# Altium PCB PCB1.pcbdoc
Units mil, origin at the board's own origin, x right, y up, seen from the top; angles counter-clockwise.
Board outline 5500 x 4110 mil, 2 copper layers (Top Layer, Bottom Layer); 18 components, 15 nets, 64 pads, 0 vias.
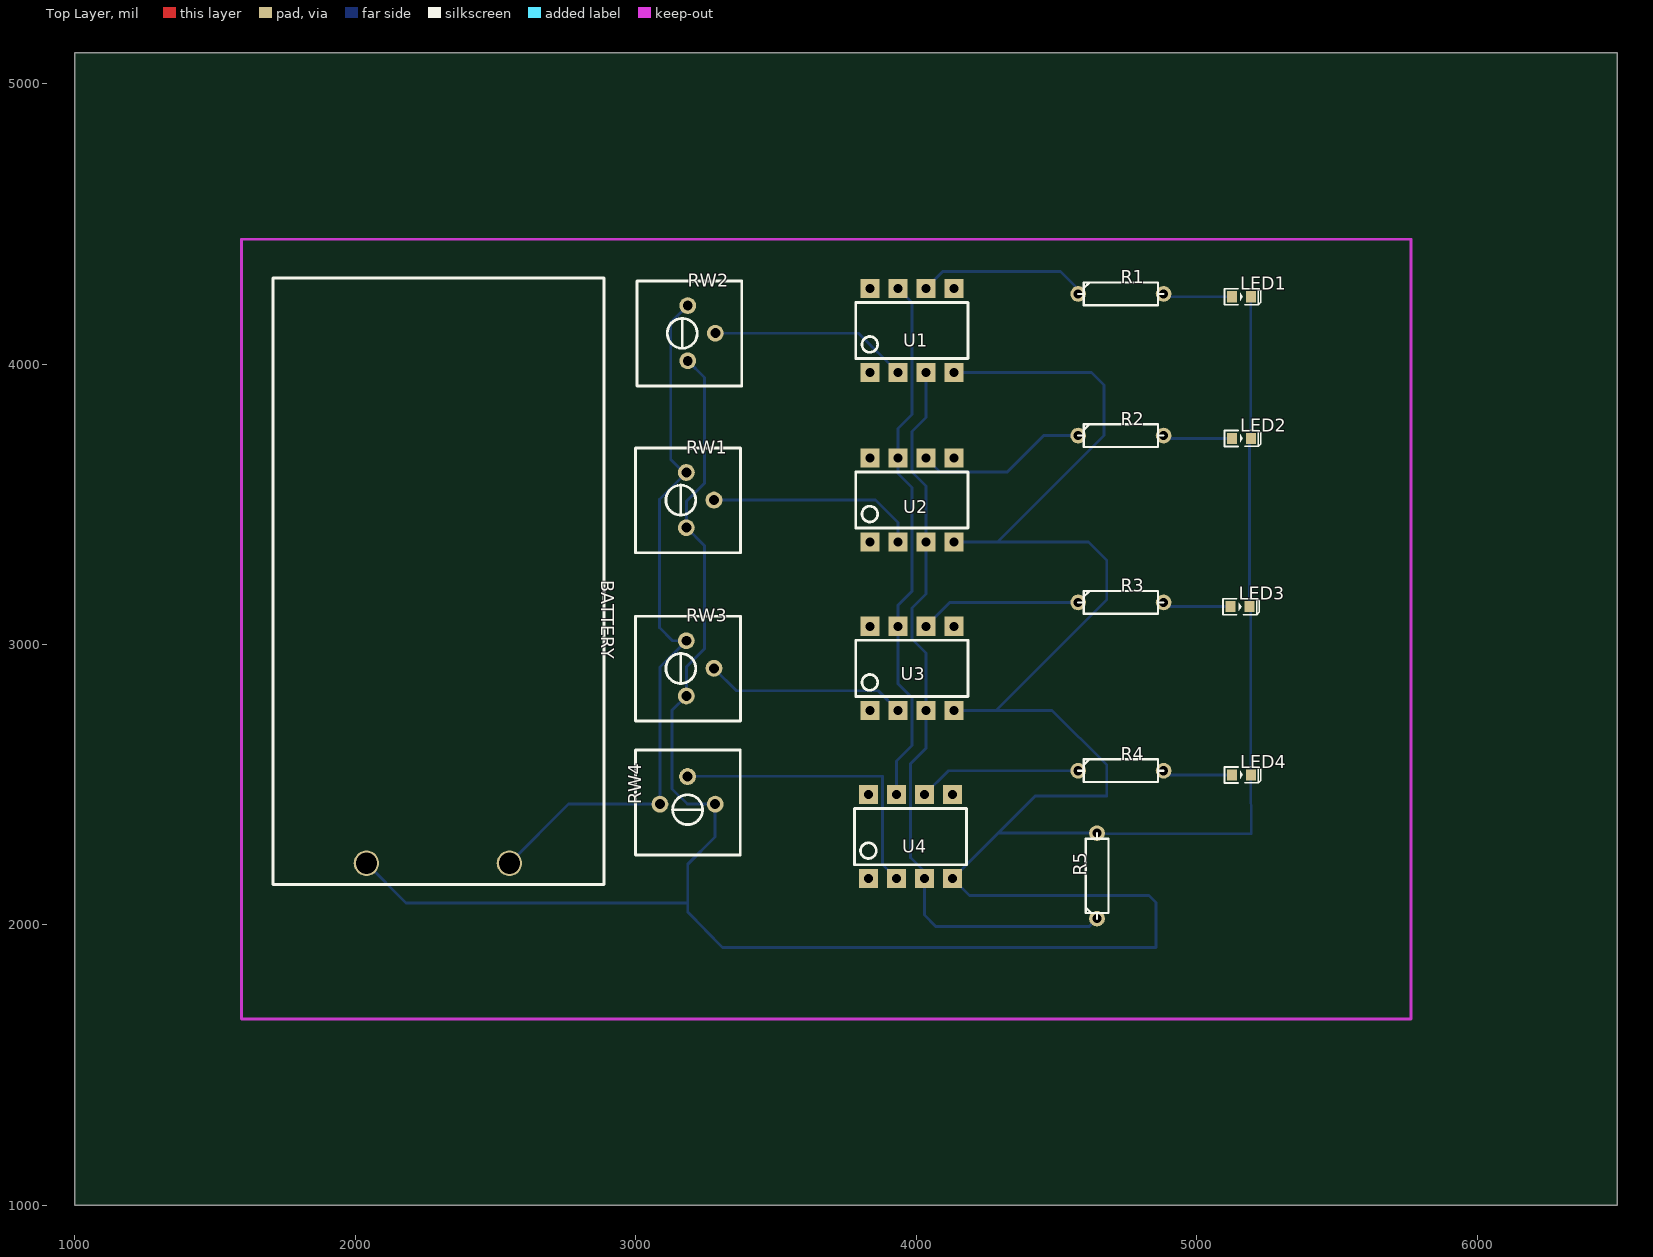
[diagram p0: Top Layer view]
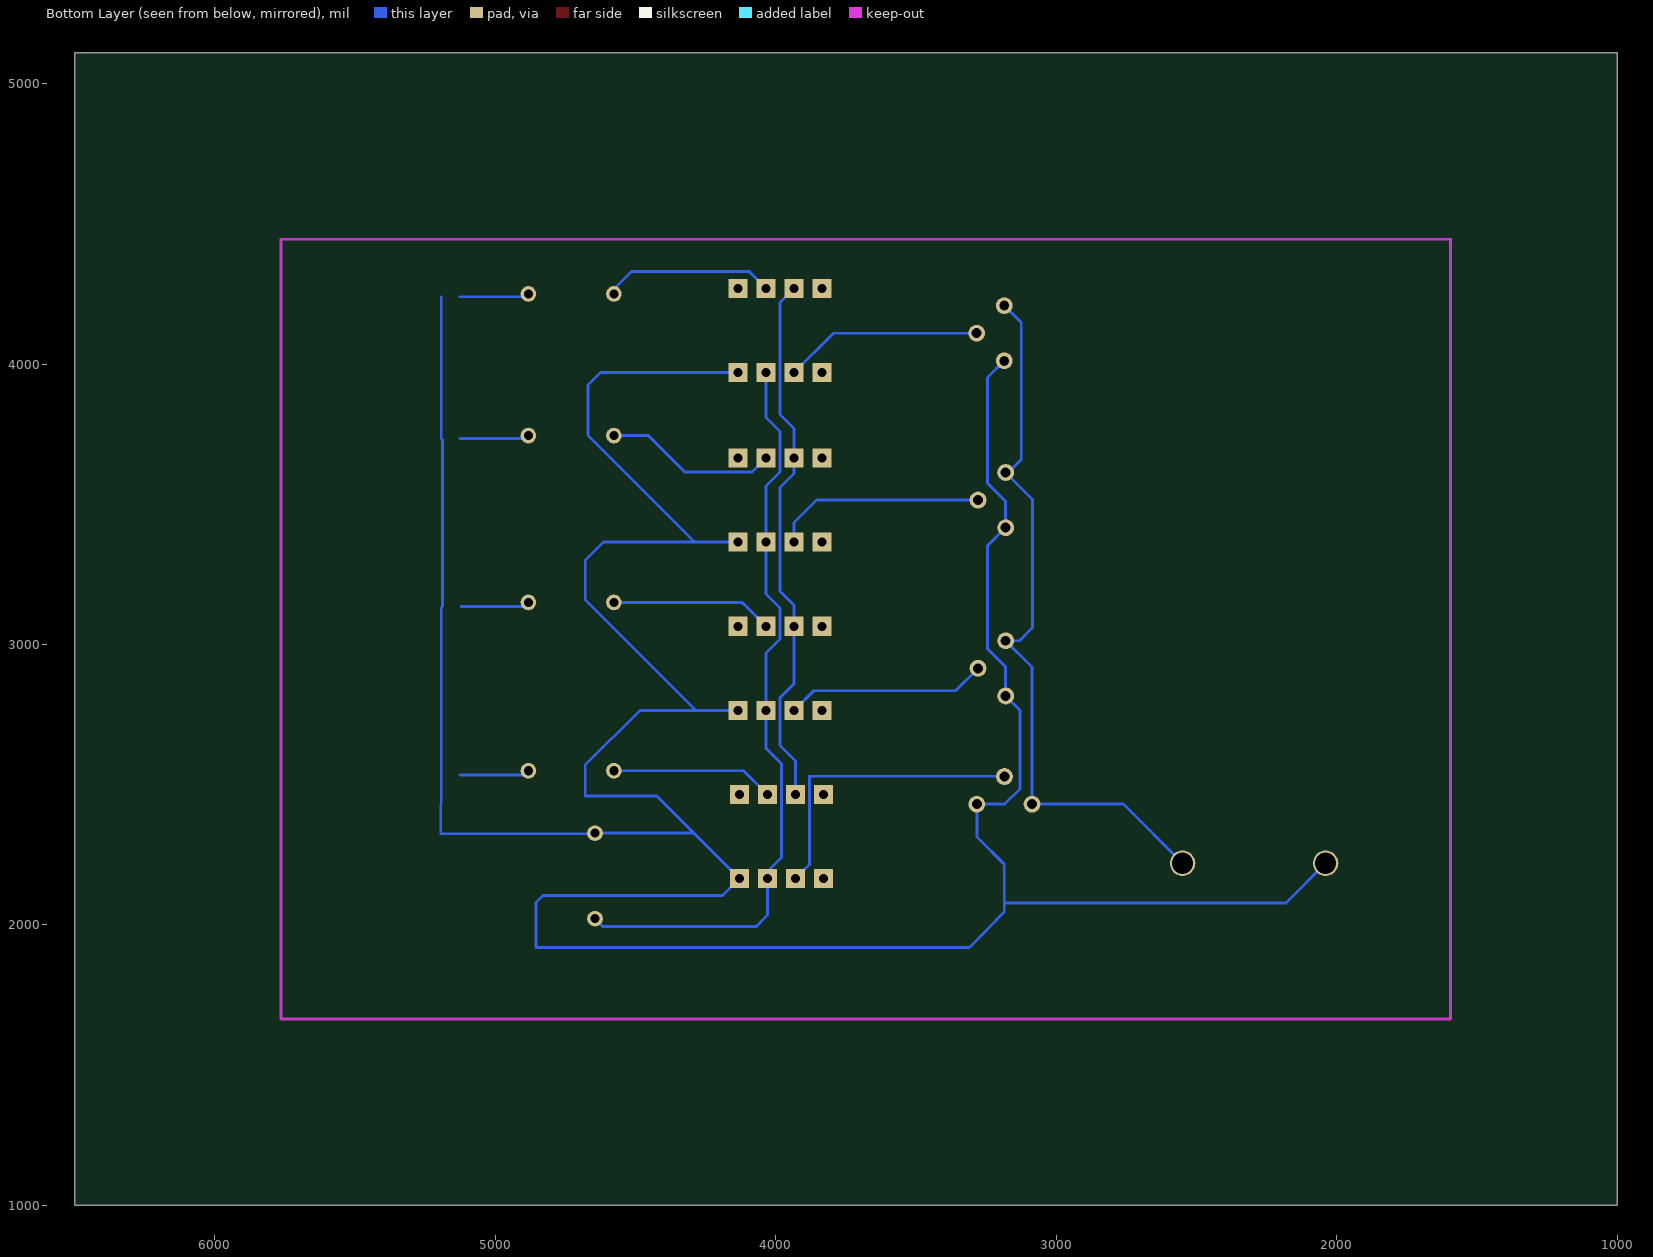
[diagram p1: Bottom Layer view, seen from below]

## Layer stack, top to bottom
Top Solder: solder mask 0.4, Solder Resist, Dk 3.5
Top Layer: signal copper 1.4
Dielectric1: dielectric 12.6, FR-4, Dk 4.8
Bottom Layer: signal copper 1.4
Bottom Solder: solder mask 0.4, Solder Resist, Dk 3.5

## Board outline
6500,1000 1000,1000 1000,5110 6500,5110

## Design rules (kind name [scope] priority, off if disabled: settings)
Clearance [All] p1: gap=10 ignorepadtopadclearanceinfootprint=FALSE
PolygonConnect [All] p1: connectstyle=Relief reliefconductorwidth=10 reliefentries=4 polygonreliefangle="90 Angle" airgapwidth=10
RoutingVias [All] p1: holewidth=28 width=50 viastyle="Through Hole" minholewidth=28 minwidth=50 maxholewidth=28 maxwidth=50
SolderMaskExpansion [All] p1: expansion=0 istentingtop=FALSE
Width [All] p1: maxlimit=10 minlimit=10 preferedwidth=10
30 further rules are at their usual default settings.

## Components (designator, comment, footprint, x,y, rotation, side; value= is the part's Value field where it differs from the comment)
BATTERY "9V" BATTCON_9V 2295,2220 r270 top
LED1 "LED" LED0603_RED 5160,4240 r0 top
LED2 "LED" LED0603_RED 5160,3735 r0 top
LED3 "LED" LED0603_RED 5155,3135 r0 top
LED4 "LED" LED0603_RED 5160,2535 r0 top
R1 "220" R3 4730,4250 r0 top
R2 "220" R3 4730,3745 r0 top
R3 "220" R3 4730,3150 r0 top
R4 "220" R3 4730,2550 r0 top
R5 "10K" R3 4645,2175 r90 top
RW1 "10K" RES-ADJ_3386P 3230,3515 r0 top
RW2 "10K" RES-ADJ_3386P 3235,4110 r0 top
RW3 "10K" RES-ADJ_3386P 3230,2915 r0 top
RW4 "10K" RES-ADJ_3386P 3185,2480 r90 top
U1 "LM358" DIP08 3985,4120 r0 top
U2 "LM358" DIP08 3985,3515 r0 top
U3 "LM358" DIP08 3985,2915 r0 top
U4 "LM358" DIP08 3980,2315 r0 top

## Footprints (in the part's own frame and the unit in brackets; to place one, negate y for a bottom-side part, rotate by r counter-clockwise, add the part's x,y. Pads: shape width x height; smd on the part's side, far side on the other; paste and mask are expansions set on the pad)
BATTCON_9V [mil]
  round 90.7 hole 75 paste-99999 mask+4: +(0,255) -(0,-255)
  silkscreen extent -2087,-588 76,592
DIP08 [mil]
  rect 68x68 hole 32 paste-99999 mask+4: 1(-150,-150) 2(-50,-150) 3(50,-150) 4(150,-150) 5(150,150) 6(50,150) 7(-50,150) 8(-150,150)
  silkscreen extent -200,-100 200,100
LED0603_RED [mm]
  rect 0.9x1 smd paste+0 mask+0.102: 1(-0.85,0) 2(0.85,0)
  silkscreen extent -1.54,-0.73 1.75,0.73
R3 [mil]
  round 55.9 hole 32.6 paste-99999 mask+4: 1(-152.4,0) 2(152.4,0)
  silkscreen extent -152,-41 152,41
RES-ADJ_3386P [mil]
  round 60 hole 35.43 paste-99999 mask+4: 1(-49.21,-98.43) 2(49.21,-0.01) 3(-49.21,98.43)
  silkscreen extent -231,-188 143,186

## Nets (pads, with @x,y where several pads share a name; then routed paths per layer and width w, separated by ;. In a path a pad name is that pad's centre, name@x,y a point inside that pad or via, vN(x,y) a via of type N, cw(c..) or ccw(c..) an arc to the next point about the centre after c; other vN are vias at no path point)
+9V: BATTERY.+ RW1.3 RW2.3 RW3.3 RW4.3 U1.7 U2.7 U3.7 U4.7 | length 4533.8
  Bottom Layer w10: BATTERY.+ 2760.79,2430.79 RW4.3 3086.57,2919.21 RW3.3 3131.57,3013.43 3085,3060 3085,3517.64 RW1.3 3171.57,3613.43 3125,3660 3125,4147.64 RW2.3 ; U4.7 3930,2585 3985,2640 3985,2810 3935,2860 U3.7 3935,3140 3985,3190 3985,3560 3935,3610 U2.7 3935,3770 3985,3820 3985,4220 U1.7
GND: BATTERY.- LED1.2 LED2.2 LED3.2 LED4.2 R5.2 RW1.1 RW2.1 RW3.1 RW4.1 U1.4 U2.4 U3.4 U4.4 | length 13406.6
  Bottom Layer w10: BATTERY.- 2181.5,2078.5 3185.8,2078.5 ; RW2.1 3245,3952.36 3245,3575 3180.79,3510.79 RW1.1 3245,3352.36 3245,2985 3180.79,2920.79 RW3.1 3130,2765.78 3130,2485 3184.21,2430.79 RW4.1 3283.43,2314.22 3185.8,2216.6 3185.8,2045.8 3310,1920 4855,1920 4855,2080 4830,2105 4190,2105 U4.4 ; U1.4 4625,3970 4670,3925 4670,3745 4290,3365 U2.4 4615,3365 4680,3300 4680,3160 4285,2765 U3.4 4485,2765 4680,2570 4680,2460 4425,2460 U4.4 ; 5193.46,4240 5193.46,3735 5188.46,3730 5188.46,3135 5193.46,3130 5193.46,2535 5195,2325 5160,2325 4647.4,2325 R5.2 4292.4,2327.4 U4.4
R1_1: R1.1 U1.6 | length 610.8
  Bottom Layer w10: U1.6 4095,4330 4515,4330 4577.6,4267.4 R1.1
R1_2: LED1.1 R1.2 | length 248.3
  Bottom Layer w10: R1.2 4892.4,4240 5126.53,4240
R2_1: R2.1 U2.6 | length 617.2
  Bottom Layer w10: U2.6 4085,3615 4325,3615 4455,3745 R2.1
R2_2: LED2.1 R2.2 | length 248.3
  Bottom Layer w10: R2.2 4892.4,3735 5126.53,3735
R3_1: R3.1 U3.6 | length 577.8
  Bottom Layer w10: U3.6 4120,3150 R3.1
R3_2: LED3.1 R3.2 | length 245.3
  Bottom Layer w10: R3.2 4897.4,3135 5121.53,3135
R4_1: R4.1 U4.6 | length 582.8
  Bottom Layer w10: U4.6 4115,2550 R4.1
R4_2: LED4.1 R4.2 | length 250.3
  Bottom Layer w10: R4.2 4897.4,2535 5126.53,2535
U1_2: RW2.2 U1.2 | length 708.8
  Bottom Layer w10: RW2.2 3795.01,4109.99 U1.2
U2_2: RW1.2 U2.2 | length 758.9
  Bottom Layer w10: RW1.2 3855.01,3514.99 3935,3435 U2.2
U3_2: RW3.2 U3.2 | length 717.9
  Bottom Layer w10: RW3.2 3359.2,2835 3865,2835 U3.2
U4_2: RW4.2 U4.2 | length 1080.7
  Bottom Layer w10: RW4.2 3880,2530 3880,2215 U4.2
VCC: R5.1 U1.3 U2.3 U3.3 U4.3 | length 2704.3
  Bottom Layer w10: U1.3 4035,3810 3985,3760 3985,3615 4035,3565 U2.3 4035,3180 3985,3130 3985,3020 4035,2970 U3.3 4035,2630 3980,2575 3980,2240 4030,2190 U4.3 4030,2035 4070,1995 4617.4,1995 R5.1
pads on no net: U1.1 U1.5 U1.8 U2.1 U2.5 U2.8 U3.1 U3.5 U3.8 U4.1 U4.5 U4.8